# EAGLE board TransistorSwitchSensor (EAGLE 7.7.0)
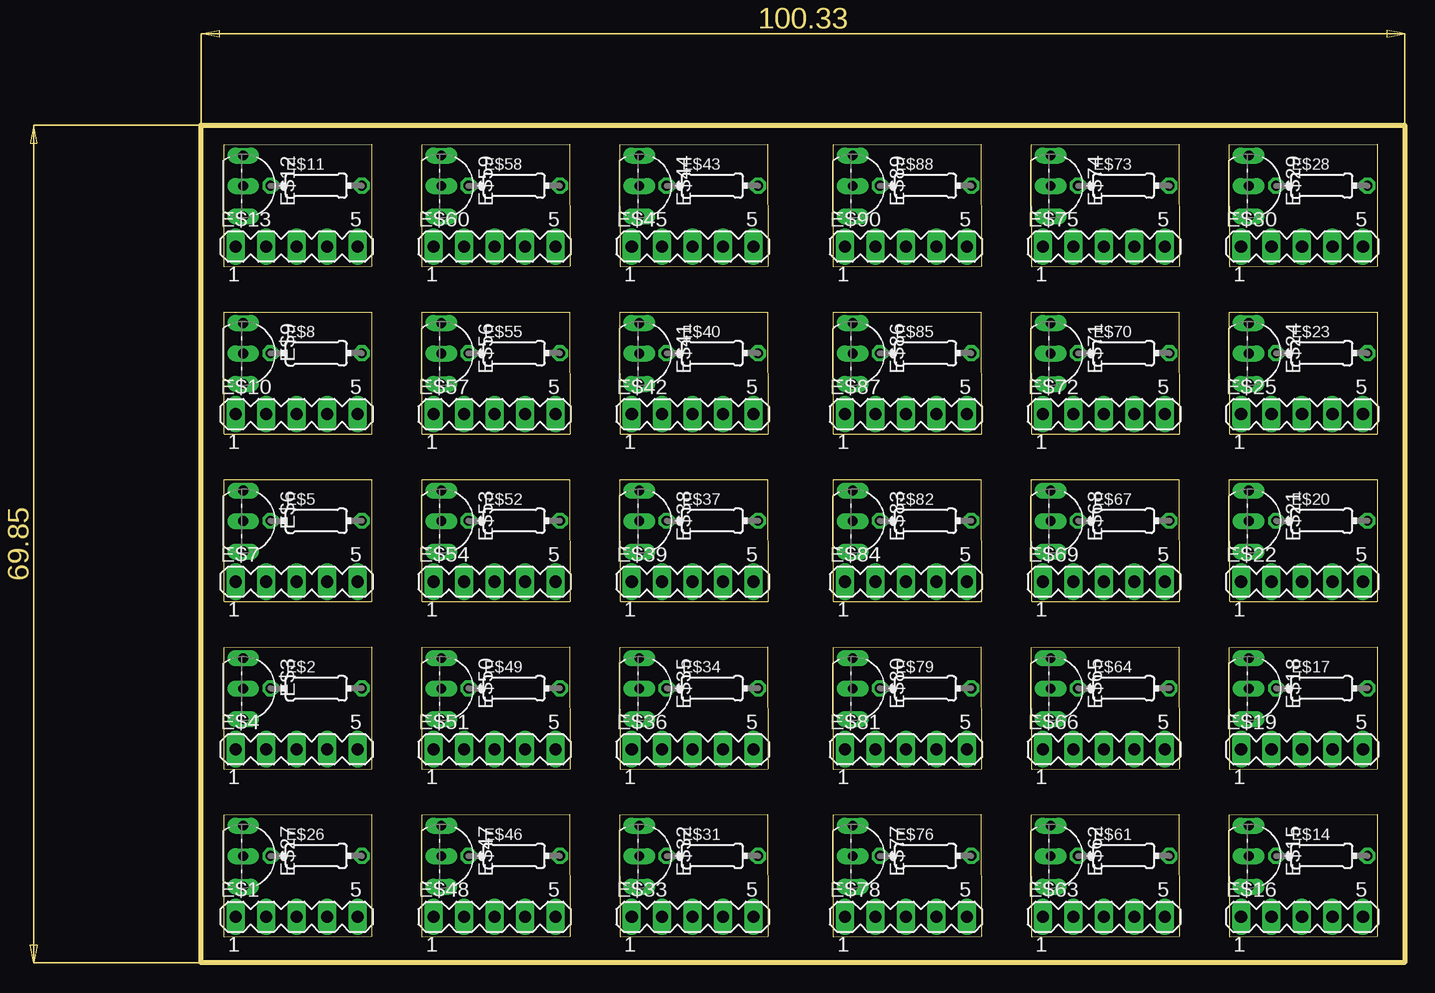
[diagram p0: board, top side]
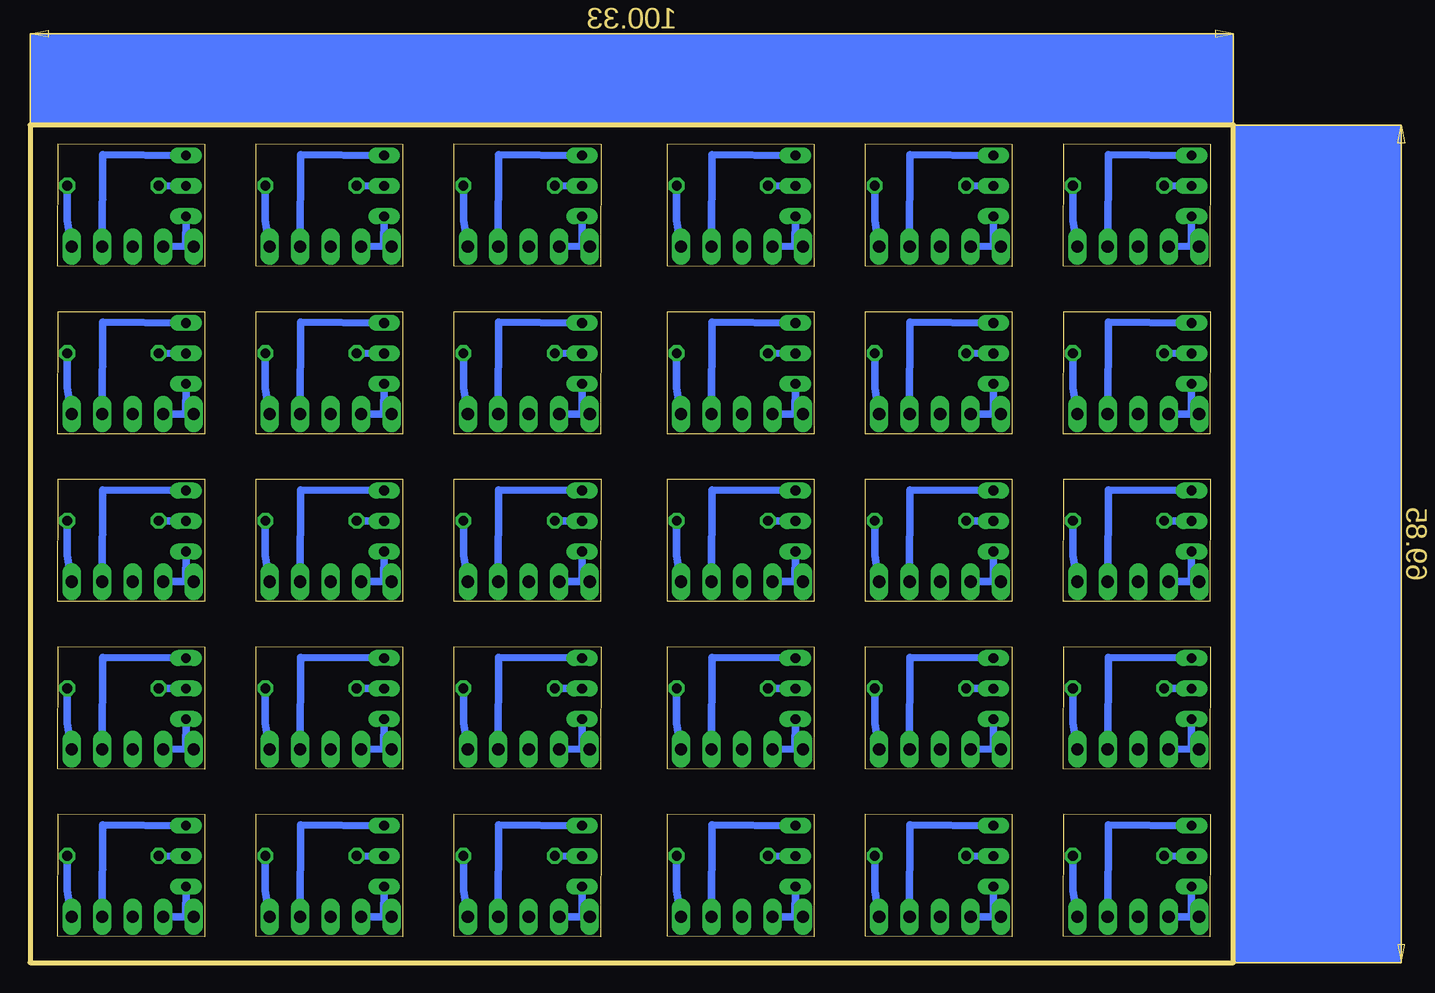
[diagram p1: board, bottom side, seen from below]

Size 100.33 x 69.85 mm. Coordinates in mm from the lower left corner, seen from the top.
Outline: 1.93,2.17 1.91,12.33 14.2,12.35 14.22,2.19 1.93,2.17
Outline: 0,0 0,69.85 100.33,69.85 100.33,0 0,0
Outline: 1.93,16.14 1.91,26.3 14.2,26.32 14.22,16.16 1.93,16.14
Outline: 1.93,30.11 1.91,40.27 14.2,40.29 14.22,30.13 1.93,30.11
Outline: 1.93,44.08 1.91,54.24 14.2,54.26 14.22,44.1 1.93,44.08
Outline: 1.93,58.05 1.91,68.21 14.2,68.23 14.22,58.07 1.93,58.05
Outline: 85.75,2.17 85.72,12.33 98.02,12.35 98.04,2.19 85.75,2.17
Outline: 85.75,16.14 85.72,26.3 98.02,26.32 98.04,16.16 85.75,16.14
Outline: 85.75,30.11 85.72,40.27 98.02,40.29 98.04,30.13 85.75,30.11
Outline: 85.75,44.08 85.72,54.24 98.02,54.26 98.04,44.1 85.75,44.08
Outline: 85.75,58.05 85.72,68.21 98.02,68.23 98.04,58.07 85.75,58.05
Outline: 34.95,2.17 34.92,12.33 47.22,12.35 47.24,2.19 34.95,2.17
Outline: 34.95,16.14 34.92,26.3 47.22,26.32 47.24,16.16 34.95,16.14
Outline: 34.95,30.11 34.92,40.27 47.22,40.29 47.24,30.13 34.95,30.11
Outline: 34.95,44.08 34.92,54.24 47.22,54.26 47.24,44.1 34.95,44.08
Outline: 34.95,58.05 34.92,68.21 47.22,68.23 47.24,58.07 34.95,58.05
Outline: 18.43,2.17 18.41,12.33 30.71,12.35 30.73,2.19 18.43,2.17
Outline: 18.43,16.14 18.41,26.3 30.71,26.32 30.73,16.16 18.43,16.14
Outline: 18.43,30.11 18.41,40.27 30.71,40.29 30.73,30.13 18.43,30.11
Outline: 18.43,44.08 18.41,54.24 30.71,54.26 30.73,44.1 18.43,44.08
Outline: 18.43,58.05 18.41,68.21 30.71,68.23 30.73,58.07 18.43,58.05
Outline: 69.23,2.17 69.22,12.33 81.51,12.35 81.53,2.19 69.23,2.17
Outline: 69.23,16.14 69.22,26.3 81.51,26.32 81.53,16.16 69.23,16.14
Outline: 69.23,30.11 69.22,40.27 81.51,40.29 81.53,30.13 69.23,30.11
Outline: 69.23,44.08 69.22,54.24 81.51,54.26 81.53,44.1 69.23,44.08
Outline: 69.23,58.05 69.22,68.21 81.51,68.23 81.53,58.07 69.23,58.05
Outline: 52.73,2.17 52.7,12.33 65,12.35 65.02,2.19 52.73,2.17
Outline: 52.73,16.14 52.7,26.3 65,26.32 65.02,16.16 52.73,16.14
Outline: 52.73,30.11 52.7,40.27 65,40.29 65.02,30.13 52.73,30.11
Outline: 52.73,44.08 52.7,54.24 65,54.26 65.02,44.1 52.73,44.08
Outline: 52.73,58.05 52.7,68.21 65,68.23 65.02,58.07 52.73,58.05
Copper layers (1*16): Top 0.035mm / dielectric 1.5mm / Bottom 0.035mm
Design rules "default": minimum track width 10mil, minimum drill 24mil, track to track 8mil, track to pad 8mil, pad to pad 8mil, via to via 8mil, smd to smd 8mil, copper to edge 40mil, drill to drill 8mil, minimum pad ring 10mil, minimum via ring 8mil, stop-mask expansion 4mil, vias tented up to drill 0mil, thermal gap 10mil

## Footprints (pad centres in the part's own frame; a part is rotated, then mirrored left to right if it is on the bottom)
MA05-1 = drill 1.016 long: 1 -5.08,0; 2 -2.54,0; 3 0,0; 4 2.54,0; 5 5.08,0
0204/7 = drill 0.813 octagon: 1 -3.81,0; 2 3.81,0
TO92- = drill 0.813 long: 1 2.54,0; 2 0,0; 3 -2.54,0

## Placement (x,y rotation side)
E$1  [MA05-1]  7.95,3.83 0 top
E$2  [0204/7]  9.59,22.88 0 top
E$3  [TO92-]  3.5,22.86 270 top
E$4  [MA05-1]  7.95,17.8 0 top
E$5  [0204/7]  9.59,36.85 0 top
E$6  [TO92-]  3.5,36.83 270 top
E$7  [MA05-1]  7.95,31.77 0 top
E$8  [0204/7]  9.59,50.82 0 top
E$9  [TO92-]  3.5,50.8 270 top
E$10  [MA05-1]  7.95,45.74 0 top
E$11  [0204/7]  9.59,64.79 0 top
E$12  [TO92-]  3.5,64.77 270 top
E$13  [MA05-1]  7.95,59.71 0 top
E$14  [0204/7]  93.41,8.91 0 top
E$15  [TO92-]  87.32,8.89 270 top
E$16  [MA05-1]  91.77,3.83 0 top
E$17  [0204/7]  93.41,22.88 0 top
E$18  [TO92-]  87.32,22.86 270 top
E$19  [MA05-1]  91.77,17.8 0 top
E$20  [0204/7]  93.41,36.85 0 top
E$21  [TO92-]  87.32,36.83 270 top
E$22  [MA05-1]  91.77,31.77 0 top
E$23  [0204/7]  93.41,50.82 0 top
E$24  [TO92-]  87.32,50.8 270 top
E$25  [MA05-1]  91.77,45.74 0 top
E$26  [0204/7]  9.59,8.91 0 top
E$27  [TO92-]  3.5,8.89 270 top
E$28  [0204/7]  93.41,64.79 0 top
E$29  [TO92-]  87.32,64.77 270 top
E$30  [MA05-1]  91.77,59.71 0 top
E$31  [0204/7]  42.61,8.91 0 top
E$32  [TO92-]  36.52,8.89 270 top
E$33  [MA05-1]  40.97,3.83 0 top
E$34  [0204/7]  42.61,22.88 0 top
E$35  [TO92-]  36.52,22.86 270 top
E$36  [MA05-1]  40.97,17.8 0 top
E$37  [0204/7]  42.61,36.85 0 top
E$38  [TO92-]  36.52,36.83 270 top
E$39  [MA05-1]  40.97,31.77 0 top
E$40  [0204/7]  42.61,50.82 0 top
E$41  [TO92-]  36.52,50.8 270 top
E$42  [MA05-1]  40.97,45.74 0 top
E$43  [0204/7]  42.61,64.79 0 top
E$44  [TO92-]  36.52,64.77 270 top
E$45  [MA05-1]  40.97,59.71 0 top
E$46  [0204/7]  26.1,8.91 0 top
E$47  [TO92-]  20.01,8.89 270 top
E$48  [MA05-1]  24.46,3.83 0 top
E$49  [0204/7]  26.1,22.88 0 top
E$50  [TO92-]  20.01,22.86 270 top
E$51  [MA05-1]  24.46,17.8 0 top
E$52  [0204/7]  26.1,36.85 0 top
E$53  [TO92-]  20.01,36.83 270 top
E$54  [MA05-1]  24.46,31.77 0 top
E$55  [0204/7]  26.1,50.82 0 top
E$56  [TO92-]  20.01,50.8 270 top
E$57  [MA05-1]  24.46,45.74 0 top
E$58  [0204/7]  26.1,64.79 0 top
E$59  [TO92-]  20.01,64.77 270 top
E$60  [MA05-1]  24.46,59.71 0 top
E$61  [0204/7]  76.9,8.91 0 top
E$62  [TO92-]  70.81,8.89 270 top
E$63  [MA05-1]  75.26,3.83 0 top
E$64  [0204/7]  76.9,22.88 0 top
E$65  [TO92-]  70.81,22.86 270 top
E$66  [MA05-1]  75.26,17.8 0 top
E$67  [0204/7]  76.9,36.85 0 top
E$68  [TO92-]  70.81,36.83 270 top
E$69  [MA05-1]  75.26,31.77 0 top
E$70  [0204/7]  76.9,50.82 0 top
E$71  [TO92-]  70.81,50.8 270 top
E$72  [MA05-1]  75.26,45.74 0 top
E$73  [0204/7]  76.9,64.79 0 top
E$74  [TO92-]  70.81,64.77 270 top
E$75  [MA05-1]  75.26,59.71 0 top
E$76  [0204/7]  60.39,8.91 0 top
E$77  [TO92-]  54.3,8.89 270 top
E$78  [MA05-1]  58.75,3.83 0 top
E$79  [0204/7]  60.39,22.88 0 top
E$80  [TO92-]  54.3,22.86 270 top
E$81  [MA05-1]  58.75,17.8 0 top
E$82  [0204/7]  60.39,36.85 0 top
E$83  [TO92-]  54.3,36.83 270 top
E$84  [MA05-1]  58.75,31.77 0 top
E$85  [0204/7]  60.39,50.82 0 top
E$86  [TO92-]  54.3,50.8 270 top
E$87  [MA05-1]  58.75,45.74 0 top
E$88  [0204/7]  60.39,64.79 0 top
E$89  [TO92-]  54.3,64.77 270 top
E$90  [MA05-1]  58.75,59.71 0 top

## Library data of the parts
E$1 E$4 E$7 E$10 E$13 E$16 E$19 E$22 E$25 E$30 E$33 E$36 E$39 E$42 E$45 E$48 E$51 E$54 E$57 E$60 E$63 E$66 E$69 E$72 E$75 E$78 E$81 E$84 E$87 E$90 = con-lstb
E$2 E$5 E$8 E$11 E$14 E$17 E$20 E$23 E$26 E$28 E$31 E$34 E$37 E$40 E$43 E$46 E$49 E$52 E$55 E$58 E$61 E$64 E$67 E$70 E$73 E$76 E$79 E$82 E$85 E$88 = eagle-ltspice
E$3 E$6 E$9 E$12 E$15 E$18 E$21 E$24 E$27 E$29 E$32 E$35 E$38 E$41 E$44 E$47 E$50 E$53 E$56 E$59 E$62 E$65 E$68 E$71 E$74 E$77 E$80 E$83 E$86 E$89 = transistor-fet

## Nets
S$2: E$1.5 E$26.2
S$3: E$1.1 E$1.2 E$27.1
S$4: E$2.1 E$3.2
S$5: E$1.4 E$27.3
S$7: E$3.1 E$4.1 E$4.2
S$8: E$2.2 E$4.5
S$9: E$3.3 E$4.4
S$10: E$26.1 E$27.2
S$11: E$5.1 E$6.2
S$12: E$6.1 E$7.1 E$7.2
S$13: E$5.2 E$7.5
S$14: E$6.3 E$7.4
S$15: E$8.1 E$9.2
S$16: E$9.1 E$10.1 E$10.2
S$17: E$8.2 E$10.5
S$18: E$9.3 E$10.4
S$19: E$11.1 E$12.2
S$20: E$12.1 E$13.1 E$13.2
S$21: E$11.2 E$13.5
S$22: E$12.3 E$13.4
S$23: E$14.1 E$15.2
S$24: E$15.1 E$16.1 E$16.2
S$25: E$14.2 E$16.5
S$26: E$15.3 E$16.4
S$27: E$17.1 E$18.2
S$28: E$18.1 E$19.1 E$19.2
S$29: E$17.2 E$19.5
S$30: E$18.3 E$19.4
S$31: E$20.1 E$21.2
S$32: E$21.1 E$22.1 E$22.2
S$33: E$20.2 E$22.5
S$34: E$21.3 E$22.4
S$35: E$23.1 E$24.2
S$36: E$24.1 E$25.1 E$25.2
S$37: E$23.2 E$25.5
S$38: E$24.3 E$25.4
S$39: E$28.1 E$29.2
S$40: E$29.1 E$30.1 E$30.2
S$41: E$28.2 E$30.5
S$42: E$29.3 E$30.4
S$43: E$31.1 E$32.2
S$44: E$32.1 E$33.1 E$33.2
S$45: E$31.2 E$33.5
S$46: E$32.3 E$33.4
S$47: E$34.1 E$35.2
S$48: E$35.1 E$36.1 E$36.2
S$49: E$34.2 E$36.5
S$50: E$35.3 E$36.4
S$51: E$37.1 E$38.2
S$52: E$38.1 E$39.1 E$39.2
S$53: E$37.2 E$39.5
S$54: E$38.3 E$39.4
S$55: E$40.1 E$41.2
S$56: E$41.1 E$42.1 E$42.2
S$57: E$40.2 E$42.5
S$58: E$41.3 E$42.4
S$59: E$43.1 E$44.2
S$60: E$44.1 E$45.1 E$45.2
S$61: E$43.2 E$45.5
S$62: E$44.3 E$45.4
S$63: E$46.1 E$47.2
S$64: E$47.1 E$48.1 E$48.2
S$65: E$46.2 E$48.5
S$66: E$47.3 E$48.4
S$67: E$49.1 E$50.2
S$68: E$50.1 E$51.1 E$51.2
S$69: E$49.2 E$51.5
S$70: E$50.3 E$51.4
S$71: E$52.1 E$53.2
S$72: E$53.1 E$54.1 E$54.2
S$73: E$52.2 E$54.5
S$74: E$53.3 E$54.4
S$75: E$55.1 E$56.2
S$76: E$56.1 E$57.1 E$57.2
S$77: E$55.2 E$57.5
S$78: E$56.3 E$57.4
S$79: E$58.1 E$59.2
S$80: E$59.1 E$60.1 E$60.2
S$81: E$58.2 E$60.5
S$82: E$59.3 E$60.4
S$83: E$61.1 E$62.2
S$84: E$62.1 E$63.1 E$63.2
S$85: E$61.2 E$63.5
S$86: E$62.3 E$63.4
S$87: E$64.1 E$65.2
S$88: E$65.1 E$66.1 E$66.2
S$89: E$64.2 E$66.5
S$90: E$65.3 E$66.4
S$91: E$67.1 E$68.2
S$92: E$68.1 E$69.1 E$69.2
S$93: E$67.2 E$69.5
S$94: E$68.3 E$69.4
S$95: E$70.1 E$71.2
S$96: E$71.1 E$72.1 E$72.2
S$97: E$70.2 E$72.5
S$98: E$71.3 E$72.4
S$99: E$73.1 E$74.2
S$100: E$74.1 E$75.1 E$75.2
S$101: E$73.2 E$75.5
S$102: E$74.3 E$75.4
S$103: E$76.1 E$77.2
S$104: E$77.1 E$78.1 E$78.2
S$105: E$76.2 E$78.5
S$106: E$77.3 E$78.4
S$107: E$79.1 E$80.2
S$108: E$80.1 E$81.1 E$81.2
S$109: E$79.2 E$81.5
S$110: E$80.3 E$81.4
S$111: E$82.1 E$83.2
S$112: E$83.1 E$84.1 E$84.2
S$113: E$82.2 E$84.5
S$114: E$83.3 E$84.4
S$115: E$85.1 E$86.2
S$116: E$86.1 E$87.1 E$87.2
S$117: E$85.2 E$87.5
S$118: E$86.3 E$87.4
S$119: E$88.1 E$89.2
S$120: E$89.1 E$90.1 E$90.2
S$121: E$88.2 E$90.5
S$122: E$89.3 E$90.4

## Tracks (layer width: path | path; a pad name or v marks a point on that pad's centre or on a via)
S$2
  Bottom 0.61: E$1.5 13.4,6 E$26.2
S$3
  Bottom 0.61: 3.52,3.85 E$27.1 | E$1.2 3.52,3.85 | 3.52,3.85 E$1.1
S$4
  Bottom 0.61: E$3.2 E$2.1
S$5
  Bottom 0.61: E$27.3 10.45,11.49 E$1.4
S$7
  Bottom 0.61: 3.52,17.82 E$3.1 | E$4.2 3.52,17.82 | 3.52,17.82 E$4.1
S$8
  Bottom 0.61: E$4.5 13.4,19.97 E$2.2
S$9
  Bottom 0.61: E$3.3 10.45,25.46 E$4.4
S$10
  Bottom 0.61: E$27.2 E$26.1
S$11
  Bottom 0.61: E$6.2 E$5.1
S$12
  Bottom 0.61: 3.52,31.79 E$6.1 | E$7.2 3.52,31.79 | 3.52,31.79 E$7.1
S$13
  Bottom 0.61: E$7.5 13.4,33.94 E$5.2
S$14
  Bottom 0.61: E$6.3 10.45,39.43 E$7.4
S$15
  Bottom 0.61: E$9.2 E$8.1
S$16
  Bottom 0.61: 3.52,45.76 E$9.1 | E$10.2 3.52,45.76 | 3.52,45.76 E$10.1
S$17
  Bottom 0.61: E$10.5 13.4,47.91 E$8.2
S$18
  Bottom 0.61: E$9.3 10.45,53.4 E$10.4
S$19
  Bottom 0.61: E$12.2 E$11.1
S$20
  Bottom 0.61: 3.52,59.73 E$12.1 | E$13.2 3.52,59.73 | 3.52,59.73 E$13.1
S$21
  Bottom 0.61: E$13.5 13.4,61.88 E$11.2
S$22
  Bottom 0.61: E$12.3 10.45,67.37 E$13.4
S$23
  Bottom 0.61: E$15.2 E$14.1
S$24
  Bottom 0.61: 87.34,3.85 E$15.1 | E$16.2 87.34,3.85 | 87.34,3.85 E$16.1
S$25
  Bottom 0.61: E$16.5 97.22,6 E$14.2
S$26
  Bottom 0.61: E$15.3 94.27,11.49 E$16.4
S$27
  Bottom 0.61: E$18.2 E$17.1
S$28
  Bottom 0.61: 87.34,17.82 E$18.1 | E$19.2 87.34,17.82 | 87.34,17.82 E$19.1
S$29
  Bottom 0.61: E$19.5 97.22,19.97 E$17.2
S$30
  Bottom 0.61: E$18.3 94.27,25.46 E$19.4
S$31
  Bottom 0.61: E$21.2 E$20.1
S$32
  Bottom 0.61: 87.34,31.79 E$21.1 | E$22.2 87.34,31.79 | 87.34,31.79 E$22.1
S$33
  Bottom 0.61: E$22.5 97.22,33.94 E$20.2
S$34
  Bottom 0.61: E$21.3 94.27,39.43 E$22.4
S$35
  Bottom 0.61: E$24.2 E$23.1
S$36
  Bottom 0.61: 87.34,45.76 E$24.1 | E$25.2 87.34,45.76 | 87.34,45.76 E$25.1
S$37
  Bottom 0.61: E$25.5 97.22,47.91 E$23.2
S$38
  Bottom 0.61: E$24.3 94.27,53.4 E$25.4
S$39
  Bottom 0.61: E$29.2 E$28.1
S$40
  Bottom 0.61: 87.34,59.73 E$29.1 | E$30.2 87.34,59.73 | 87.34,59.73 E$30.1
S$41
  Bottom 0.61: E$30.5 97.22,61.88 E$28.2
S$42
  Bottom 0.61: E$29.3 94.27,67.37 E$30.4
S$43
  Bottom 0.61: E$32.2 E$31.1
S$44
  Bottom 0.61: 36.55,3.85 E$32.1 | E$33.2 36.55,3.85 | 36.55,3.85 E$33.1
S$45
  Bottom 0.61: E$33.5 46.42,6 E$31.2
S$46
  Bottom 0.61: E$32.3 43.47,11.49 E$33.4
S$47
  Bottom 0.61: E$35.2 E$34.1
S$48
  Bottom 0.61: 36.55,17.82 E$35.1 | E$36.2 36.55,17.82 | 36.55,17.82 E$36.1
S$49
  Bottom 0.61: E$36.5 46.42,19.97 E$34.2
S$50
  Bottom 0.61: E$35.3 43.47,25.46 E$36.4
S$51
  Bottom 0.61: E$38.2 E$37.1
S$52
  Bottom 0.61: 36.55,31.79 E$38.1 | E$39.2 36.55,31.79 | 36.55,31.79 E$39.1
S$53
  Bottom 0.61: E$39.5 46.42,33.94 E$37.2
S$54
  Bottom 0.61: E$38.3 43.47,39.43 E$39.4
S$55
  Bottom 0.61: E$41.2 E$40.1
S$56
  Bottom 0.61: 36.55,45.76 E$41.1 | E$42.2 36.55,45.76 | 36.55,45.76 E$42.1
S$57
  Bottom 0.61: E$42.5 46.42,47.91 E$40.2
S$58
  Bottom 0.61: E$41.3 43.47,53.4 E$42.4
S$59
  Bottom 0.61: E$44.2 E$43.1
S$60
  Bottom 0.61: 36.55,59.73 E$44.1 | E$45.2 36.55,59.73 | 36.55,59.73 E$45.1
S$61
  Bottom 0.61: E$45.5 46.42,61.88 E$43.2
S$62
  Bottom 0.61: E$44.3 43.47,67.37 E$45.4
S$63
  Bottom 0.61: E$47.2 E$46.1
S$64
  Bottom 0.61: 20.04,3.85 E$47.1 | E$48.2 20.04,3.85 | 20.04,3.85 E$48.1
S$65
  Bottom 0.61: E$48.5 29.91,6 E$46.2
S$66
  Bottom 0.61: E$47.3 26.96,11.49 E$48.4
S$67
  Bottom 0.61: E$50.2 E$49.1
S$68
  Bottom 0.61: 20.04,17.82 E$50.1 | E$51.2 20.04,17.82 | 20.04,17.82 E$51.1
S$69
  Bottom 0.61: E$51.5 29.91,19.97 E$49.2
S$70
  Bottom 0.61: E$50.3 26.96,25.46 E$51.4
S$71
  Bottom 0.61: E$53.2 E$52.1
S$72
  Bottom 0.61: 20.04,31.79 E$53.1 | E$54.2 20.04,31.79 | 20.04,31.79 E$54.1
S$73
  Bottom 0.61: E$54.5 29.91,33.94 E$52.2
S$74
  Bottom 0.61: E$53.3 26.96,39.43 E$54.4
S$75
  Bottom 0.61: E$56.2 E$55.1
S$76
  Bottom 0.61: 20.04,45.76 E$56.1 | E$57.2 20.04,45.76 | 20.04,45.76 E$57.1
S$77
  Bottom 0.61: E$57.5 29.91,47.91 E$55.2
S$78
  Bottom 0.61: E$56.3 26.96,53.4 E$57.4
S$79
  Bottom 0.61: E$59.2 E$58.1
S$80
  Bottom 0.61: 20.04,59.73 E$59.1 | E$60.2 20.04,59.73 | 20.04,59.73 E$60.1
S$81
  Bottom 0.61: E$60.5 29.91,61.88 E$58.2
S$82
  Bottom 0.61: E$59.3 26.96,67.37 E$60.4
S$83
  Bottom 0.61: E$62.2 E$61.1
S$84
  Bottom 0.61: 70.83,3.85 E$62.1 | E$63.2 70.83,3.85 | 70.83,3.85 E$63.1
S$85
  Bottom 0.61: E$63.5 80.71,6 E$61.2
S$86
  Bottom 0.61: E$62.3 77.76,11.49 E$63.4
S$87
  Bottom 0.61: E$65.2 E$64.1
S$88
  Bottom 0.61: 70.83,17.82 E$65.1 | E$66.2 70.83,17.82 | 70.83,17.82 E$66.1
S$89
  Bottom 0.61: E$66.5 80.71,19.97 E$64.2
S$90
  Bottom 0.61: E$65.3 77.76,25.46 E$66.4
S$91
  Bottom 0.61: E$68.2 E$67.1
S$92
  Bottom 0.61: 70.83,31.79 E$68.1 | E$69.2 70.83,31.79 | 70.83,31.79 E$69.1
S$93
  Bottom 0.61: E$69.5 80.71,33.94 E$67.2
S$94
  Bottom 0.61: E$68.3 77.76,39.43 E$69.4
S$95
  Bottom 0.61: E$71.2 E$70.1
S$96
  Bottom 0.61: 70.83,45.76 E$71.1 | E$72.2 70.83,45.76 | 70.83,45.76 E$72.1
S$97
  Bottom 0.61: E$72.5 80.71,47.91 E$70.2
S$98
  Bottom 0.61: E$71.3 77.76,53.4 E$72.4
S$99
  Bottom 0.61: E$74.2 E$73.1
S$100
  Bottom 0.61: 70.83,59.73 E$74.1 | E$75.2 70.83,59.73 | 70.83,59.73 E$75.1
S$101
  Bottom 0.61: E$75.5 80.71,61.88 E$73.2
S$102
  Bottom 0.61: E$74.3 77.76,67.37 E$75.4
S$103
  Bottom 0.61: E$77.2 E$76.1
S$104
  Bottom 0.61: 54.33,3.85 E$77.1 | E$78.2 54.33,3.85 | 54.33,3.85 E$78.1
S$105
  Bottom 0.61: E$78.5 64.2,6 E$76.2
S$106
  Bottom 0.61: E$77.3 61.25,11.49 E$78.4
S$107
  Bottom 0.61: E$80.2 E$79.1
S$108
  Bottom 0.61: 54.33,17.82 E$80.1 | E$81.2 54.33,17.82 | 54.33,17.82 E$81.1
S$109
  Bottom 0.61: E$81.5 64.2,19.97 E$79.2
S$110
  Bottom 0.61: E$80.3 61.25,25.46 E$81.4
S$111
  Bottom 0.61: E$83.2 E$82.1
S$112
  Bottom 0.61: 54.33,31.79 E$83.1 | E$84.2 54.33,31.79 | 54.33,31.79 E$84.1
S$113
  Bottom 0.61: E$84.5 64.2,33.94 E$82.2
S$114
  Bottom 0.61: E$83.3 61.25,39.43 E$84.4
S$115
  Bottom 0.61: E$86.2 E$85.1
S$116
  Bottom 0.61: 54.33,45.76 E$86.1 | E$87.2 54.33,45.76 | 54.33,45.76 E$87.1
S$117
  Bottom 0.61: E$87.5 64.2,47.91 E$85.2
S$118
  Bottom 0.61: E$86.3 61.25,53.4 E$87.4
S$119
  Bottom 0.61: E$89.2 E$88.1
S$120
  Bottom 0.61: 54.33,59.73 E$89.1 | E$90.2 54.33,59.73 | 54.33,59.73 E$90.1
S$121
  Bottom 0.61: E$90.5 64.2,61.88 E$88.2
S$122
  Bottom 0.61: E$89.3 61.25,67.37 E$90.4
(copper drawn outside any net)
  shapes: Bottom area x2